# Altium PCB IoT_1062.PcbDoc (part 2 of 3)
Units mm, origin at the board's own origin, x right, y up, seen from the top; angles counter-clockwise.
Board outline 174.13 x 100.2 mm, 2 copper layers (Top Layer, Bottom Layer); 191 components, 138 nets, 1095 pads, 196 vias.
Unrouted connection lines stored in the file: 289.
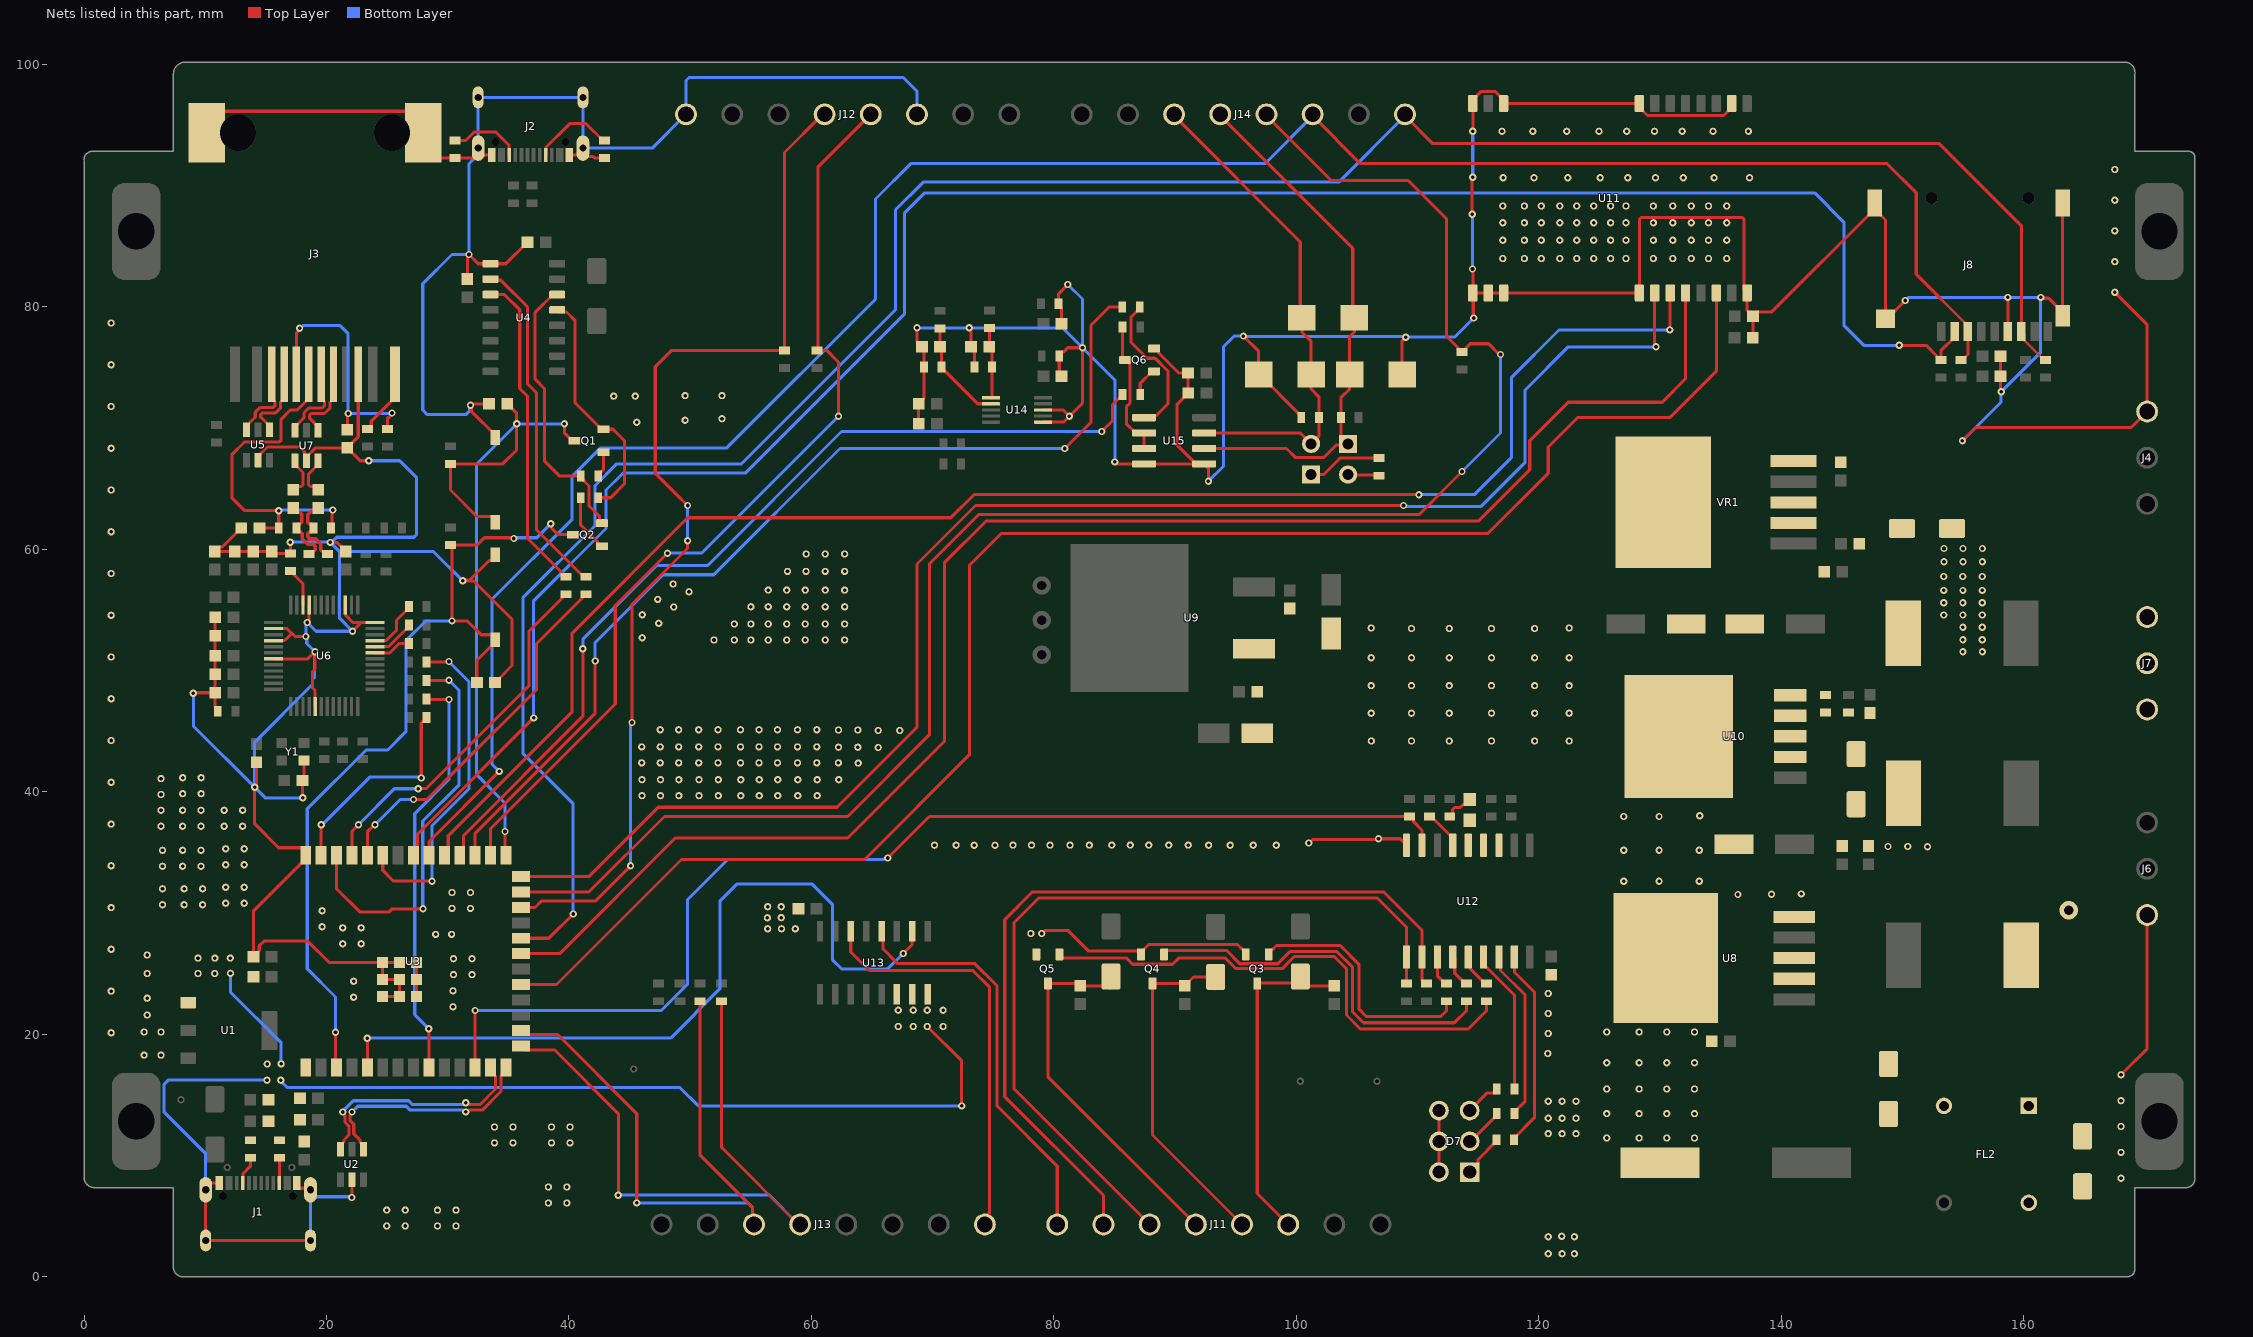
[diagram p2: the nets of this part, all layers, seen from the top]

## Via types
v1: diameter 0.6, hole 0.3, Top Layer to Bottom Layer, tented both sides, 195 vias
v2: diameter 1.524, hole 0.762, Top Layer to Bottom Layer, tented both sides, 1 vias

## Nets (pads, with @x,y where several pads share a name; then routed paths per layer and width w, separated by ;. In a path a pad name is that pad's centre, name@x,y a point inside that pad or via, vN(x,y) a via of type N, cw(c..) or ccw(c..) an arc to the next point about the centre after c; other vN are vias at no path point) (continued)
A+: D12.1 D13.2 J14.4 P1.1 R67.1 U15.6 | length 45
  Top Layer w0.254: U15.6@92.391,68.326 99.187,68.326 99.949,67.564 102.235,67.564 103.285,68.614 104.174,68.614 P1.1@104.267,68.707 103.669,69.305 R67.1@103.669,70.866 103.669,72.51 104.394,73.235 D12.1@104.394,74.422 104.394,77.547 104.781,77.934 D13.2@104.781,79.121 104.654,79.248 104.654,84.83 J14.4@93.726,95.758
AIN2: C48.2 R56.2 R58.1 U14.6 | length 5.9
  Top Layer w0.254: R56.2@74.676,78.269 74.676,76.72 C48.2@74.664,76.708 74.893,76.479 R58.1@74.893,75.057 74.893,72.514 74.88,72.501 U14.6@74.812,72.501
AIN3: C47.2 R55.2 R57.1 U14.7 | length 8.6
  Top Layer w0.254: R55.2@70.612,78.232 C47.2@70.612,76.708 70.739,76.581 70.739,74.932 70.937,74.734 70.99,74.734 73.71,72.014 74.799,72.014 U14.7@74.812,72.001
AUX: U3.19 U11.24 | length 136.4
  Top Layer w0.254: U3.19@36.048,24.117 38.976,24.117 49.276,34.417 64.389,34.417 73.025,43.053 73.025,58.674 75.665,61.314 115.797,61.314 120.777,66.294 120.777,68.453 123.19,70.866 130.81,70.866 134.644,74.7 U11.24@134.644,81.154
B-: D13.1 D14.2 J14.3 P2.2 R70.2 U15.7 | length 41.5
  Top Layer w0.254: J14.3@89.916,95.758 100.324,85.35 100.324,79.248 D13.1@100.451,79.121 100.451,77.934 101.219,77.166 D14.2@101.219,74.422 101.219,73.235 101.854,72.6 R70.2@101.854,70.866 101.854,69.342 P2.2@101.219,68.707 100.33,69.596 U15.7@92.391,69.596
BOOT: BOOT.1 C8.1 Q1.3 R11.2 U3.27 | length 60.9
  Top Layer w0.254: BOOT.1@33.909,62.23 33.909,62.43 33.636,62.703 32.42,62.703 30.226,64.897 R11.2@30.226,67.056 34.544,67.056 35.687,68.199 35.687,71.235 35.271,71.651 35.271,71.666 34.928,72.009 C8.1@34.913,72.009 ; v1(34.727,36.735) 34.727,34.843 U3.27@34.798,34.772 ; v1(39.624,70.358) 39.624,69.618 40.281,68.961 Q1.3@40.456,68.961
  Bottom Layer w0.254: v1(34.727,36.735) 34.727,39.06 32.385,41.402 32.385,67.049 35.685,70.349 v1(35.685,70.367) ; v1@35.694,70.358 v1(39.624,70.358)
CRD: C25.2 J3.P6 R26.1 R27.1 | length 28.2
  Top Layer w0.254: C25.2@14.478,61.763 R26.1@16.063,61.763 16.063,63.193 v1(16.06,63.196) 13.258,63.196 12.192,64.262 12.192,67.818 13.231,68.857 16.107,68.857 16.256,69.006 16.256,70.739 17.02,71.503 17.597,71.503 18.54,72.446 J3.P6@18.54,74.441 ; R27.1@20.373,61.763 20.447,61.837 20.447,63.087 20.519,63.159 v1(20.519,63.253)
  Bottom Layer w0.254: v1(16.06,63.196) 16.118,63.253 v1(20.519,63.253)
CS: J14.5 R71.2 U3.25 | length 144.8
  Top Layer w0.254: U3.25@36.048,31.737 41.643,31.737 47.879,37.973 62.992,37.973 69.723,44.704 69.723,58.801 73.787,62.865 110.109,62.865 v1(113.665,66.421) ; J14.5@97.536,95.758 102.87,90.424 109.22,90.424 112.395,87.249 112.395,77.56 113.342,76.613 113.342,76.488 R71.2@113.54,76.29 ; R71.2@113.665,76.29 114.337,76.962 115.857,76.962 116.746,76.073 v1(116.84,76.073)
  Bottom Layer w0.254: v1(113.665,66.421) 116.84,69.596 116.84,71.205 v1(116.84,76.073)
CS_CD: J8.2 R61.2 U3.33 | length 175.4
  Top Layer w0.254: U3.33@27.178,34.772 27.501,35.095 27.501,36.518 v1(37.084,46.101) ; v1(149.733,76.835) 151.945,76.835 152.839,75.941 152.839,75.816 153.037,75.618 R61.2@153.162,75.618 153.162,76.389 154.298,77.525 J8.2@154.298,77.975
  Bottom Layer w0.254: v1(37.084,46.101) 37.084,55.753 43.053,61.722 43.053,64.897 44.45,66.294 54.541,66.294 67.691,79.444 67.691,87.757 69.342,89.408 142.748,89.408 145.161,86.995 145.161,78.486 146.812,76.835 v1(149.733,76.835)
CTD: C27.2 J3.P5 R31.1 | length 21.3
  Top Layer w0.254: J3.P5@17.52,74.441 17.52,77.878 17.78,78.138 v1(17.78,78.232) ; C27.2@21.717,69.879 21.717,71.136 v1(21.788,71.207) ; R31.1@25.019,69.944 25.019,70.772 25.4,71.153 v1(25.4,71.247)
  Bottom Layer w0.254: v1(17.78,78.232) 17.848,78.232 18.102,78.486 21.082,78.486 21.788,77.78 v1(21.788,71.207) 21.808,71.227 25.38,71.227 v1(25.4,71.247)
D_N: U2.6 U3.13 | length 19
  Top Layer w0.254: U2.6@21.148,10.526 21.148,10.836 21.44,11.128 21.44,11.291 21.844,11.695 21.844,12.421 21.521,12.744 21.521,13.322 21.348,13.495 v1(21.348,13.589) ; v1@31.738,14.203 32.655,14.203 33.936,15.484 33.936,16.564 33.528,16.972 U3.13@33.528,17.272
  Bottom Layer w0.254: v1(21.348,13.589) 21.348,13.655 22.217,14.524 26.776,14.524 27.097,14.203 31.254,14.203 31.402,14.351 v1(31.496,14.351)
D_P: U2.4 U3.14 | length 18.8
  Top Layer w0.254: v1(22.098,13.589) 22.098,13.495 21.925,13.322 21.925,12.911 22.248,12.588 22.248,11.799 22.652,11.395 22.756,11.291 22.756,11.128 23.048,10.836 U2.4@23.048,10.526 ; v1@31.738,13.749 32.843,13.749 34.39,15.296 34.39,16.564 34.798,16.972 U3.14@34.798,17.272
  Bottom Layer w0.254: v1(22.098,13.589) 22.58,14.07 26.588,14.07 26.909,13.749 31.254,13.749 31.402,13.601 v1(31.496,13.601)
DTR: Q1.2 R14.2 U4.13 | length 20.2
  Top Layer w0.254: U4.13@39.028,79.756 39.205,79.579 39.801,79.579 40.513,78.867 40.513,72.079 42.681,69.911 43.627,69.911 44.577,68.961 44.577,65.405 43.434,64.262 R14.2@42.418,64.262
ESP32_CLK: R34.1 U3.38 | length 33.1
  Top Layer w0.254: U3.38@20.828,34.772 20.828,32.004 22.733,30.099 25.163,30.099 25.417,30.353 v1(27.959,30.353) ; R34.1@28.247,49.19 30.025,49.19 v1@30.046,49.211
  Bottom Layer w0.254: v1(27.959,30.353) 27.94,30.372 27.94,37.592 30.942,40.594 30.942,48.368 v1(30.099,49.211)
ESP32_CS: R35.1 U3.35 | length 27.6
  Top Layer w0.254: U3.35@24.638,34.772 24.638,33.528 25.527,32.639 v1(28.702,32.639) ; R35.1@28.247,50.714 30.035,50.714 v1@30.074,50.753
  Bottom Layer w0.254: v1(28.702,32.639) 28.702,37.211 31.75,40.259 31.75,49.076 v1@30.074,50.753
  other v1: 30.099,50.753
ESP32_MISO: R33.1 U3.9 | length 33.9
  Top Layer w0.254: R33.1@28.247,47.666 28.288,47.625 v1(30.099,47.625) ; v1(28.444,20.457) 28.448,20.453 U3.9@28.448,17.272
  Bottom Layer w0.254: v1(28.444,20.457) 27.278,21.623 27.278,38.2 30.099,41.021 v1(30.099,47.625)
ESP32_MOSI: R32.1 U3.39 | length 17.6
  Top Layer w0.254: U3.39@19.558,34.772 v1@19.558,37.211 ; v1(27.813,41.148) 27.813,45.67 27.962,45.819 28.049,45.819 28.247,46.017 R32.1@28.247,46.142
  Bottom Layer w0.254: v1(19.558,37.298) 19.652,37.298 20.264,37.911 23.567,41.214 27.747,41.214 v1(27.813,41.148)
ETH_RX_N: C21.2 U7.3 | length 3.3
  Top Layer w0.254: C21.2@19.304,64.914 19.033,65.185 18.664,65.185 18.515,65.334 18.515,66.211 19.304,67 U7.3@19.304,67.31
ETH_RX_P: C22.2 U7.1 | length 3.2
  Top Layer w0.254: C22.2@17.272,64.914 17.543,65.185 17.912,65.185 18.061,65.334 18.061,66.343 17.404,67 U7.1@17.404,67.31
EXPRES1: R23.1 U6.10 | length 3.3
  Top Layer w0.254: R23.1@17.018,58.207 17.143,58.207 17.341,58.009 17.341,57.884 18.062,57.163 U6.10@18.062,55.402
GND: BOOT.2 C1.1 C2.1 C3.1 C4.1 C5.1 C6.1 C7.1 C8.2 C9.2 C10.1 C11.1 C12.2 C13.2 C14.2 C15.2 C16.2 C17.2 C18.2 C19.2 C20.2 C23.2 C24.2 C25.1 C26.2 C27.1 C28.2 C29.1 C30.2 C31.1 C32.1 C33.2 C34.1 C35.2 C36.2 C37.1 C38.1 C39.1 C40.1 C42.1 C43.2 C44.1 C45.1 C46.1 C47.1 C48.1 C49.1 C50.1 C51.1 C52.1 C53.1 C54.1 C55.1 C56.1 D4.A D5.A D6.A D7.2 D7.4 D7.6 D8.1 D12.2 D14.1 FL2.2 J1.A1_B12 J1.B1_A12 J1.SH1 J1.SH2 J1.SH3 J1.SH4 J2.A1_B12 J2.B1_A12 J2.SH1 J2.SH2 J2.SH3 J2.SH4 J3.P10 J3.SH1 J3.SH2 J4.3 J6.1 J8.6 J8.G1 J8.G2 J8.G3 J8.G4 J12.1 J12.6 pad.6@2.235,20.125 pad.6@2.235,23.569 pad.6@2.235,27.013 pad.6@2.235,30.457 pad.6@2.235,33.9 pad.6@2.235,37.344 pad.6@2.235,40.788 pad.6@2.235,44.232 pad.6@2.235,47.676 pad.6@2.235,51.12 pad.6@2.235,54.564 pad.6@2.235,58.008 pad.6@2.235,61.452 pad.6@2.235,64.896 pad.6@2.235,68.34 pad.6@2.235,71.784 pad.6@2.235,75.228 pad.6@2.235,78.672 pad.6@4.953,18.288 pad.6@4.953,20.193 pad.6@5.207,21.59 pad.6@5.207,22.987 pad.6@5.207,25.019 pad.6@5.207,26.543 pad.6@6.35,18.288 pad.6@6.35,20.193 pad.6@6.35,37.165 pad.6@6.35,38.481 pad.6@6.35,39.78 pad.6@6.35,41.096 pad.6@6.477,30.688 pad.6@6.477,32.004 pad.6@6.477,33.863 pad.6@6.477,35.179 pad.6@8.128,33.863 pad.6@8.128,35.179 pad.6@8.128,37.165 pad.6@8.128,38.481 pad.6@8.133,39.855 pad.6@8.133,41.171 pad.6@8.255,30.688 pad.6@8.255,32.004 pad.6@9.398,25.019 pad.6@9.398,26.289 pad.6@9.652,33.863 pad.6@9.652,35.179 pad.6@9.652,37.165 pad.6@9.652,38.481 pad.6@9.657,39.855 pad.6@9.657,41.171 pad.6@9.779,30.688 pad.6@9.779,32.004 pad.6@10.779,25.013 pad.6@10.795,26.289 pad.6@11.557,37.165 pad.6@11.557,38.481 pad.6@11.684,30.815 pad.6@11.684,32.131 pad.6@11.684,33.99 pad.6@11.684,35.306 pad.6@12.065,26.289 pad.6@12.085,25.034 pad.6@13.081,37.165 pad.6@13.081,38.481 pad.6@13.208,30.815 pad.6@13.208,32.131 pad.6@13.208,33.99 pad.6@13.208,35.306 pad.6@15.091,16.221 pad.6@15.111,17.552 pad.6@16.234,16.221 pad.6@16.256,17.562 pad.6@19.638,28.874 pad.6@19.638,30.19 pad.6@21.332,27.467 pad.6@21.332,28.783 pad.6@22.237,23.058 pad.6@22.237,24.374 pad.6@22.856,27.467 pad.6@22.856,28.783 pad.6@24.97,4.187 pad.6@24.97,5.503 pad.6@26.494,4.187 pad.6@26.494,5.503 pad.6@29.001,28.241 pad.6@29.161,4.187 pad.6@29.161,5.503 pad.6@30.317,28.241 pad.6@30.349,30.388 pad.6@30.349,31.704 pad.6@30.433,22.27 pad.6@30.433,23.586 pad.6@30.476,24.927 pad.6@30.476,26.243 pad.6@30.685,4.187 pad.6@30.685,5.503 pad.6@31.873,30.388 pad.6@31.873,31.704 pad.6@32,24.927 pad.6@32,26.243 pad.6@33.86,11.045 pad.6@33.86,12.361 pad.6@35.384,11.045 pad.6@35.384,12.361 pad.6@38.305,6.092 pad.6@38.305,7.408 pad.6@38.559,11.045 pad.6@38.559,12.361 pad.6@39.829,6.092 pad.6@39.829,7.408 pad.6@40.083,11.045 pad.6@40.083,12.361 pad.6@43.688,72.644 pad.6@45.466,72.644 pad.6@45.593,70.485 pad.6@45.998,42.391 pad.6@45.998,43.707 pad.6@46.05,54.606 pad.6@46.022,39.69 pad.6@46.022,41.006 pad.6@46.041,52.71 pad.6@47.32,55.876 pad.6@47.406,53.902 pad.6@47.522,42.391 pad.6@47.522,43.707 pad.6@47.522,45.121 pad.6@47.546,39.69 pad.6@47.546,41.006 pad.6@48.59,57.146 pad.6@48.641,55.245 pad.6@49.07,39.69 pad.6@49.07,41.006 pad.6@49.046,42.391 pad.6@49.046,43.707 pad.6@49.046,45.121 pad.6@49.579,70.655 pad.6@49.579,72.687 pad.6@49.898,56.502 pad.6@50.697,42.391 pad.6@50.697,43.707 pad.6@50.697,45.121 pad.6@50.721,39.69 pad.6@50.721,41.006 pad.6@51.965,52.532 pad.6@52.299,42.391 pad.6@52.299,43.707 pad.6@52.299,45.121 pad.6@52.323,39.69 pad.6@52.323,41.006 pad.6@52.627,70.782 pad.6@52.627,72.687 pad.6@53.644,52.532 pad.6@53.644,53.848 pad.6@54.148,42.391 pad.6@54.148,43.707 pad.6@54.148,45.121 pad.6@54.172,39.69 pad.6@54.172,41.006 pad.6@55.01,52.532 pad.6@55.01,53.848 pad.6@55.01,55.262 pad.6@55.672,42.391 pad.6@55.672,43.707 pad.6@55.672,45.121 pad.6@55.696,39.69 pad.6@55.696,41.006 pad.6@56.368,29.611 pad.6@56.388,28.702 pad.6@56.388,30.533 pad.6@56.438,52.532 pad.6@56.438,53.848 pad.6@56.438,55.262 pad.6@56.438,56.643 pad.6@57.22,39.69 pad.6@57.22,41.006 pad.6@57.196,42.391 pad.6@57.196,43.707 pad.6@57.196,45.121 pad.6@57.506,30.533 pad.6@57.508,29.628 pad.6@57.531,28.702 pad.6@57.962,52.532 pad.6@57.962,53.848 pad.6@57.962,55.262 pad.6@57.962,56.643 pad.6@58.028,58.185 pad.6@58.674,28.702 pad.6@58.847,42.391 pad.6@58.847,43.707 pad.6@58.847,45.121 pad.6@58.871,39.69 pad.6@58.871,41.006 pad.6@59.486,52.532 pad.6@59.486,53.848 pad.6@59.486,55.262 pad.6@59.486,56.643 pad.6@59.552,58.185 pad.6@59.563,59.619 pad.6@60.448,42.391 pad.6@60.448,43.707 pad.6@60.448,45.121 pad.6@60.473,39.69 pad.6@60.473,41.006 pad.6@61.137,52.532 pad.6@61.137,53.848 pad.6@61.137,55.262 pad.6@61.137,56.643 pad.6@61.137,58.185 pad.6@61.137,59.619 pad.6@62.23,43.688 pad.6@62.23,45.102 pad.6@62.25,41.006 pad.6@62.226,42.391 pad.6@62.738,52.532 pad.6@62.738,53.848 pad.6@62.738,55.262 pad.6@62.738,56.643 pad.6@62.738,58.185 pad.6@62.738,59.619 pad.6@63.86,42.372 pad.6@63.831,43.688 pad.6@63.831,45.102 pad.6@65.507,43.663 pad.6@65.507,45.06 pad.6@67.163,20.65 pad.6@67.163,21.991 pad.6@67.285,45.06 pad.6@68.396,20.65 pad.6@68.396,21.991 pad.6@69.552,20.65 pad.6@69.552,21.991 pad.6@70.153,35.603 pad.6@70.859,20.65 pad.6@70.859,21.991 pad.6@71.931,35.603 pad.6@73.425,35.593 pad.6@75.142,35.593 pad.6@76.627,35.61 pad.6@78.105,28.321 pad.6@78.151,35.61 pad.6@78.994,28.321 pad.6@79.675,35.61 pad.6@81.326,35.61 pad.6@82.927,35.61 pad.6@84.776,35.61 pad.6@86.3,35.61 pad.6@87.824,35.61 pad.6@89.475,35.61 pad.6@91.077,35.61 pad.6@92.759,35.603 pad.6@94.537,35.603 pad.6@96.442,35.603 pad.6@98.347,35.603 pad.6@106.172,46.491 pad.6@106.172,48.768 pad.6@106.172,51.059 pad.6@106.172,53.522 pad.6@106.188,44.193 pad.6@109.492,44.201 pad.6@109.492,46.491 pad.6@109.492,48.768 pad.6@109.492,51.059 pad.6@109.492,53.472 pad.6@112.614,44.201 pad.6@112.614,46.491 pad.6@112.614,48.768 pad.6@112.614,51.059 pad.6@112.614,53.472 pad.6@116.096,44.201 pad.6@116.096,46.491 pad.6@116.096,48.768 pad.6@116.096,51.059 pad.6@116.096,53.472 pad.6@116.967,94.488 pad.6@117.031,83.99 pad.6@117.031,85.503 pad.6@117.031,86.946 pad.6@117.031,88.332 pad.6@117.056,90.658 pad.6@118.809,83.99 pad.6@118.809,85.503 pad.6@118.809,86.946 pad.6@118.809,88.332 pad.6@119.507,94.488 pad.6@119.596,90.658 pad.6@119.649,44.201 pad.6@119.649,46.491 pad.6@119.649,48.768 pad.6@119.649,51.059 pad.6@119.649,53.472 pad.6@120.206,83.99 pad.6@120.206,85.503 pad.6@120.206,86.946 pad.6@120.206,88.332 pad.6@120.744,18.415 pad.6@120.777,1.905 pad.6@120.777,3.302 pad.6@120.777,11.811 pad.6@120.777,13.081 pad.6@120.777,14.478 pad.6@120.777,20.066 pad.6@120.777,21.717 pad.6@120.777,23.368 pad.6@121.73,83.99 pad.6@121.73,85.503 pad.6@121.73,86.946 pad.6@121.73,88.332 pad.6@121.92,1.905 pad.6@121.92,11.811 pad.6@121.92,13.081 pad.6@121.92,14.478 pad.6@121.883,3.339 pad.6@122.5,44.201 pad.6@122.5,46.491 pad.6@122.5,48.768 pad.6@122.5,51.059 pad.6@122.5,53.522 pad.6@122.39,90.658 pad.6@122.301,94.488 pad.6@122.936,1.905 pad.6@122.936,3.302 pad.6@123.063,11.811 pad.6@123.063,13.081 pad.6@123.063,14.478 pad.6@123.127,83.99 pad.6@123.127,85.503 pad.6@123.127,86.946 pad.6@123.127,88.332 pad.6@124.524,83.99 pad.6@124.524,85.503 pad.6@124.524,86.946 pad.6@124.524,88.332 pad.6@124.968,94.488 pad.6@125.057,90.658 pad.6@125.603,11.445 pad.6@125.603,13.462 pad.6@125.603,15.494 pad.6@125.603,17.655 pad.6@125.603,20.193 pad.6@125.921,83.99 pad.6@125.921,85.503 pad.6@125.921,86.946 pad.6@125.921,88.332 pad.6@127.191,83.99 pad.6@127.191,85.503 pad.6@127.191,86.946 pad.6@127.191,88.332 pad.6@127.254,94.488 pad.6@127.343,90.658 pad.6@128.27,11.445 pad.6@128.27,13.462 pad.6@128.27,15.494 pad.6@128.27,17.655 pad.6@128.27,20.193 pad.6@129.54,94.488 pad.6@129.453,83.99 pad.6@129.453,85.503 pad.6@129.453,86.946 pad.6@129.453,88.332 pad.6@129.629,90.658 pad.6@130.556,11.445 pad.6@130.556,13.462 pad.6@130.556,15.494 pad.6@130.556,17.655 pad.6@130.556,20.193 pad.6@131.053,83.99 pad.6@131.053,85.503 pad.6@131.053,86.946 pad.6@131.053,88.332 pad.6@131.826,94.488 pad.6@131.915,90.658 pad.6@132.577,83.99 pad.6@132.577,85.503 pad.6@132.577,86.946 pad.6@132.577,88.332 pad.6@132.842,11.445 pad.6@132.842,13.462 pad.6@132.842,15.494 pad.6@132.842,17.655 pad.6@132.842,20.193 pad.6@133.993,83.99 pad.6@133.993,85.503 pad.6@133.993,86.946 pad.6@133.993,88.332 pad.6@134.366,94.488 pad.6@134.455,90.658 pad.6@135.498,83.99 pad.6@135.498,85.503 pad.6@135.498,86.946 pad.6@135.498,88.332 pad.6@137.287,94.488 pad.6@137.376,90.658 pad.6@167.513,81.205 pad.6@167.513,83.738 pad.6@167.513,86.271 pad.6@167.513,88.804 pad.6@167.513,91.337 pad.6@168.021,8.128 pad.6@168.021,10.261 pad.6@168.021,12.395 pad.6@168.021,14.528 pad.6@168.021,16.661 Q3.2 Q4.2 Q5.2 Q6.2 R1.1 R2.1 R8.1 R9.1 R23.2 R24.2 R37.1 R57.2 R58.2 R59.2 R60.2 R70.1 RESET.2 U1.1 U2.2 U3.1 U3.40 U3.41_1 U3.41_2 U3.41_3 U3.41_4 U3.41_5 U3.41_6 U3.41_7 U3.41_8 U3.41_9 U4.1 U5.2 U6.3 U6.9 U6.14 U6.16 U6.19 U6.29 U6.48 U7.2 U8.3 U8.5 U8.6 U9.1 U10.3 U10.5 U10.6 U11.2 U11.8 U11.11 U11.13 U11.14 U11.15 U11.16 U11.19 U11.26 U12.3 U12.4 U12.5 U12.9 U13.6 U13.7 U13.8 U14.1 U14.3 U15.4 U15.5 VR1.3 VR1.5 VR1.6 Y1.2 | length 784.8
  Top Layer w0.254: v1(9.017,48.133) 9.058,48.174 C23.2@10.819,48.174 ; J3.SH1@10.13,94.361 10.13,94.769 11.503,96.142 26.597,96.142 27.97,94.769 J3.SH2@27.97,94.361 27.97,93.657 29.343,92.284 R9.1@30.607,92.284 32.002,92.284 32.51,92.792 J2.SH2@32.51,92.9 ; C17.2@10.819,54.397 C16.2@10.819,52.873 C14.2@10.819,51.222 C24.2@10.819,49.698 C23.2@10.819,48.174 ; R24.2@11.029,46.65 11.029,46.775 10.819,46.985 C23.2@10.819,48.174 ; J1.A1_B12@11.155,7.747 10.403,7.747 10.035,7.379 J1.SH1@10.035,7.177 J1.SH3@10.035,2.997 J1.SH4@18.675,2.997 ; C25.1@12.978,61.763 12.963,61.763 11.392,60.192 11.138,60.192 10.795,59.849 C12.2@10.795,59.834 C19.2@12.446,59.834 C18.2@13.97,59.834 C13.2@15.494,59.834 15.671,59.657 R23.2@17.018,59.657 17.018,60.568 v1(17.001,60.585) ; v1(14.074,40.371) 14.074,37.361 16.043,35.392 17.965,35.392 18.288,35.069 U3.40@18.288,34.772 18.288,34.472 13.97,30.154 C4.1@13.97,26.416 13.985,26.416 14.328,26.759 14.328,26.785 14.451,26.908 14.451,27.294 14.843,27.686 18.455,27.686 20.219,25.922 U3.41_3@24.608,25.922 ; v1@14.224,40.615 C20.2@14.224,42.448 ; U5.2@14.351,67.366 14.351,67.676 15.128,68.453 17.78,68.453 18.195,68.038 18.195,67.469 U7.2@18.354,67.31 18.354,67.62 19.113,68.379 C27.1@21.717,68.379 ; U6.19@15.632,50.972 18.46,50.972 v1(19.05,51.562) 19.05,50.123 18.85,49.923 18.85,48.578 19.062,48.366 U6.29@19.062,47.042 ; U6.16@15.632,52.472 15.645,52.485 16.544,52.485 17.129,53.07 16.728,53.472 U6.14@15.632,53.472 ; 17.145,53.086 17.418,52.813 v1(18.302,52.813) ; J1.B1_A12@17.555,7.747 17.555,7.477 17.728,7.304 18.548,7.304 J1.SH2@18.675,7.177 ; v1(18.032,39.507) 18.01,39.529 C26.2@18.01,40.935 18.161,41.086 Y1.2@18.161,42.583 ; v1@18.562,54.216 U6.9@18.562,55.402 ; v1(20.32,60.579) 20.845,60.579 C15.2@21.59,59.834 ; U6.3@21.562,55.402 21.575,55.389 21.575,54.572 22.175,53.972 22.866,53.972 ; v1(22.091,6.537) 22.095,6.54 22.095,8.013 U2.2@22.098,8.016 ; v1(22.144,53.25) 22.866,53.972 ; J3.P10@22.62,74.441 22.62,69.297 21.717,68.394 C27.1@21.717,68.379 ; v1(23.495,67.31) 22.771,67.31 21.717,68.364 C27.1@21.717,68.379 ; U6.48@23.992,53.972 22.866,53.972 ; U3.41_1@24.608,23.122 U3.41_4@26.008,23.122 U3.41_5@26.008,24.522 U3.41_2@24.608,24.522 U3.41_3@24.608,25.922 ; U3.41_7@27.408,23.122 U3.41_8@27.408,24.522 U3.41_9@27.408,25.922 U3.41_6@26.008,25.922 U3.41_3@24.608,25.922 ; C7.1@31.623,82.296 v1@31.623,84.107 ; v1(31.75,84.328) 32.512,83.566 U4.1@33.528,83.566 34.795,83.566 36.573,85.344 C6.1@36.588,85.344 ; J2.SH2@32.51,93.102 J2.SH2@32.51,92.9 ; C8.2@33.413,72.009 32.098,72.009 31.971,71.882 v1(31.877,71.882) 31.943,71.816 31.943,71.396 33.909,69.43 BOOT.2@33.909,69.23 ; J2.B1_A12@33.63,92.532 32.878,92.532 J2.SH2@32.51,92.9 ; C9.2@33.909,49.022 33.924,49.022 34.267,49.365 34.267,49.38 35.306,50.419 35.306,54.229 32.131,57.404 v1(31.242,57.404) 31.308,57.47 31.816,57.47 33.436,59.09 33.636,59.09 33.909,59.363 RESET.2@33.909,59.563 ; J2.A1_B12@40.03,92.532 40.782,92.532 J2.SH1@41.15,92.9 ; J2.SH1@41.15,93.102 J2.SH1@41.15,92.9 ; R8.1@42.926,92.284 42.095,92.284 41.954,92.425 41.518,92.425 41.15,92.792 J2.SH1@41.15,92.9 ; v1(68.712,78.274) 68.712,77.108 C47.1@69.112,76.708 69.289,76.531 R57.2@69.289,75.057 69.289,72.437 68.861,72.009 C45.1@68.846,72.009 68.846,70.37 C46.1@68.858,70.358 ; pad.6@69.552,20.65 72.39,17.812 v1(72.39,14.097) ; v1(73.008,78.274) 73.008,78.181 73.164,78.025 C48.1@73.164,76.708 73.443,76.429 R58.2@73.443,75.057 ; Q5.2@78.679,26.178 Q5.2@78.708,26.207 ; pad.6@78.994,28.321 79.062,28.321 79.316,28.575 81.153,28.575 82.836,26.892 86.99,26.892 Q4.2@87.188,26.694 ; U14.1@79.112,70.501 80.788,70.501 v1(81.28,70.993) ; U14.3@79.112,71.501 80.772,71.501 v1(81.28,70.993) ; C49.1@80.633,74.295 80.444,74.484 R59.2@80.444,75.946 80.444,76.071 80.642,76.269 80.767,76.269 81.133,76.635 v1(82.355,76.635) 82.355,72.068 v1(81.28,70.993) ; C50.1@80.633,78.613 80.633,79.897 80.391,80.139 R60.2@80.391,80.264 80.391,81.098 v1(81.15,81.857) ; v1(85.023,67.217) 85.184,67.056 U15.4@87.441,67.056 U15.5@91.701,67.056 ; Q4.2@87.188,26.6 Q4.2@87.188,26.694 ; Q6.2@88.265,76.576 88.44,76.576 88.638,76.378 88.638,76.203 90.292,74.549 C53.1@91.071,74.549 91.071,72.91 C54.1@91.083,72.898 90.17,71.985 90.17,68.587 U15.5@91.701,67.056 ; v1(92.744,65.612) 92.744,66.703 U15.5@92.391,67.056 U15.5@91.701,67.056 ; v1(95.631,77.597) 96.889,76.339 D14.1@96.889,74.422 96.969,74.422 100.202,71.189 100.206,71.189 100.404,70.991 R70.1@100.404,70.866 ; Q3.2@95.824,26.6 95.824,26.775 95.626,26.973 95.582,26.973 95.146,27.409 87.822,27.409 87.188,26.775 Q4.2@87.188,26.694 ; v1(101.029,35.78) 101.063,35.78 101.351,36.068 106.71,36.068 v1(106.773,36.131) 108.56,36.131 U12.9@109.093,35.598 ; D12.2@108.724,74.422 108.724,77.215 v1(109.016,77.507) ; D7.2@111.76,8.636 D7.4@111.76,11.176 D7.6@111.76,13.716 ; v1(114.505,87.644) 114.505,90.659 v1(114.55,90.704) ; v1(114.528,83.132) 114.554,83.106 U11.14@114.554,81.154 ; v1(114.554,94.488) U11.13@114.554,96.774 114.554,97.094 115.22,97.76 116.428,97.76 117.094,97.094 U11.11@117.094,96.774 U11.8@128.294,96.774 128.294,96.454 128.96,95.788 135.248,95.788 135.914,96.454 U11.2@135.914,96.774 ; v1(114.627,79.088) 114.59,79.124 114.59,81.118 U11.14@114.554,81.154 ; C55.1@137.644,77.47 137.668,77.494 C56.1@137.668,79.248 ; J8.G4@147.698,88.575 J8.G4@147.698,88.075 ; v1(150.234,80.531) 148.727,79.025 J8.G2@148.598,79.025 148.598,87.175 J8.G4@147.698,88.075 ; v1(154.94,68.961) 156.031,70.052 168.858,70.052 J4.3@170.18,71.374 170.18,78.538 pad.6@167.513,81.205 ; C51.1@158.091,75.946 C52.1@158.091,74.295 158.091,73.057 v1(158.14,73.008) ; v1(158.671,80.786) 158.684,80.773 158.684,77.989 J8.6@158.698,77.975 ; v1(161.392,80.786) 161.458,80.72 162.053,80.72 J8.G1@163.198,79.575 ; J8.G1@163.198,79.275 J8.G1@163.198,79.575 ; J8.G3@163.198,88.575 J8.G1@163.198,79.575 ; pad.6@168.021,16.661 170.18,18.82 J6.1@170.18,29.845 ; U11.14@114.554,81.154 U11.15@115.824,81.154 U11.16@117.094,81.154 U11.19@128.294,81.154 128.294,87.227 128.443,87.376 136.789,87.376 136.937,87.227 136.937,81.401 U11.26@137.184,81.154 137.184,79.717 137.653,79.248 C56.1@137.668,79.248 ; C56.1@137.668,79.248 138.011,79.591 139.214,79.591 J8.G4@147.698,88.075
  Bottom Layer w0.254: v1(9.017,48.133) 9.017,45.428 v1(14.074,40.371) ; J1.SH1@10.035,7.177 10.035,10.142 6.604,13.573 6.604,15.875 6.95,16.221 pad.6@15.091,16.221 ; pad.6@12.085,25.034 12.085,23.483 16.256,19.312 pad.6@16.256,17.562 ; pad.6@16.234,16.221 16.234,16.14 16.753,15.621 49.149,15.621 50.673,14.097 v1(72.39,14.097) ; v1(17.001,60.585) 17.033,60.617 20.282,60.617 v1(20.32,60.579) ; v1(18.032,39.507) 14.938,39.507 v1(14.074,40.371) ; v1@18.302,53.768 v1(18.302,52.813) 18.368,52.747 18.368,52.244 v1(19.05,51.562) 19.023,51.535 19.023,49.436 18.85,49.263 18.85,48.87 14.074,44.094 v1(14.074,40.371) ; v1(18.415,53.975) 19.14,53.25 v1(22.144,53.25) 21.082,54.313 21.082,59.817 ; J1.SH4@18.675,2.997 J1.SH2@18.675,6.971 ; J1.SH2@18.675,7.177 J1.SH2@18.675,6.971 ; v1(22.091,6.537) 22.025,6.603 19.043,6.603 J1.SH2@18.675,6.971 ; v1(23.495,67.31) 26.035,67.31 27.432,65.913 27.432,61.236 27.201,61.004 20.839,61.004 20.414,60.579 v1(20.32,60.579) ; v1(31.242,57.404) 28.829,59.817 21.082,59.817 ; v1(31.877,71.882) 31.811,71.816 31.811,71.434 31.496,71.12 28.321,71.12 27.94,71.501 27.94,81.915 30.353,84.328 v1(31.75,84.328) 31.75,91.817 32.51,92.577 J2.SH4@32.51,97.282 J2.SH3@41.15,97.282 J2.SH1@41.15,93.102 46.874,93.102 J12.1@49.657,95.885 49.657,98.679 49.911,98.933 67.564,98.933 68.707,97.79 J12.6@68.707,95.885 ; v1(68.712,78.274) v1(73.008,78.274) 80.715,78.274 v1(82.355,76.635) ; v1(81.15,81.857) 82.355,80.651 v1(82.355,76.635) ; v1(85.023,67.217) 85.023,73.967 v1(82.355,76.635) ; v1(92.744,65.612) 93.997,66.865 93.997,76.725 94.869,77.597 v1(95.631,77.597) 95.676,77.552 108.97,77.552 v1(109.016,77.507) 113.046,77.507 v1(114.627,79.088) ; v1(106.773,36.131) v1@106.773,36.224 ; v1(114.505,87.644) 114.528,87.621 v1(114.528,83.132) ; v1(114.55,90.704) 114.552,90.706 114.552,94.486 v1(114.554,94.488) ; v1(150.234,80.531) 150.489,80.786 v1(158.671,80.786) v1(161.392,80.786) 161.392,76.259 v1(158.14,73.008) 158.14,72.161 v1(154.94,68.961) ; v1(20.32,60.579) 21.082,59.817
  other v1: 136.42,31.536 139.19,31.557 141.645,31.582 127,32.639 129.921,32.639 133.223,32.639 127,35.179 129.921,35.179 133.223,35.179 150.425,35.496 152.055,35.482 148.805,35.5 127,37.973 129.921,37.973 133.27,38.022 154.981,51.562 156.591,51.562 154.981,52.553 156.585,52.553 154.981,53.569 156.585,53.569 153.41,54.585 154.981,54.585 156.585,54.585 153.41,55.601 154.981,55.601 156.585,55.601 153.41,56.617 154.981,56.617 156.585,56.617 153.408,57.764 154.978,57.764 156.583,57.764 153.416,58.977 154.987,58.977 156.591,58.977 153.416,60.071 154.987,60.071 156.591,60.071
GPIO_3: J13.5 R72.2 U3.15 | length 54
  Top Layer w0.254: U3.15@36.048,19.037 36.371,18.714 38.817,18.714 44.069,13.462 v1(44.069,6.731) ; R72.2@52.578,22.733 52.578,10.681 J13.5@58.941,4.318
  Bottom Layer w0.254: v1(44.069,6.731) 44.098,6.76 56.499,6.76 J13.5@58.941,4.318
GPIO_35: J12.5 R73.2 U3.28 | length 77.5
  Top Layer w0.254: U3.28@33.528,34.772 33.528,36.957 43.815,47.244 43.815,55.372 v1(48.133,59.69) ; v1(62.23,70.993) 62.23,75.438 61.251,76.417 R73.2@60.452,76.417 60.534,76.499 60.534,91.522 J12.5@64.77,95.758
  Bottom Layer w0.254: v1(48.133,59.69) 50.927,59.69 v1(62.23,70.993)
GPIO_36: R68.2 U3.29 | length 81.3
  Top Layer w0.254: U3.29@32.258,34.772 32.258,36.576 42.164,46.482 v1(42.164,50.8) ; v1(80.899,68.326) 83.058,70.485 83.058,78.486 84.582,80.01 R68.2@85.635,80.01
  Bottom Layer w0.254: v1(42.164,50.8) 42.164,52.324 47.752,57.912 51.943,57.912 62.357,68.326 v1(80.899,68.326)
GPIO_37: R66.2 U3.30 | length 75.7
  Top Layer w0.254: U3.30@30.988,34.772 31.311,35.095 31.311,36.401 41.148,46.238 v1(41.148,51.816) ; v1(83.947,69.723) 84.836,70.612 84.836,71.935 R66.2@85.672,72.771
  Bottom Layer w0.254: v1(41.148,51.816) 41.148,52.578 47.244,58.674 51.435,58.674 62.484,69.723 v1(83.947,69.723)
GPIO_46: J13.6 R76.2 U3.16 | length 51.1
  Top Layer w0.254: U3.16@36.048,20.307 36.371,19.984 39.071,19.984 45.593,13.462 v1(45.593,6.096) ; R76.2@50.8,22.733 50.8,10.059 55.131,5.728 J13.6@55.131,4.318
  Bottom Layer w0.254: v1(45.593,6.096) 54.763,6.096 55.131,5.728 J13.6@55.131,4.318
GPIO_47: J12.4 R77.2 U3.24 | length 86.6
  Top Layer w0.254: U3.24@36.048,30.467 37.198,30.467 37.719,30.988 42.164,30.988 v1(45.085,33.909) ; v1(45.197,45.727) 45.197,55.484 49.784,60.071 v1(49.784,60.706) ; v1(49.784,63.627) 48.859,64.552 47.117,66.294 47.117,75.057 48.477,76.417 R77.2@57.785,76.417 57.785,92.743 60.8,95.758 J12.4@60.96,95.758
  Bottom Layer w0.254: v1(45.085,33.909) 45.085,45.615 v1(45.197,45.727) ; v1(49.784,60.706) v1(49.784,63.627)
GREE: J3.P12 R28.1 | length 5.5
  Top Layer w0.254: R28.1@23.368,69.944 23.493,69.944 23.691,70.142 23.691,70.577 25.66,72.546 J3.P12@25.66,74.441
"IN +": D3.A J7.1 J7.3
  other v2: 163.703,30.226
"IN -": FL2.1 J7.2
INT_23008: R46.1 U3.12 U12.8 | length 95.4
  Top Layer w0.254: U3.12@32.258,17.272 v1(32.258,21.971) ; v1(66.294,34.544) 69.723,37.973 109.472,37.973 109.67,37.775 109.67,37.523 110.363,36.83 U12.8@110.363,35.598
  Bottom Layer w0.254: v1(32.258,21.971) 47.625,21.971 49.784,24.13 49.784,31.115 53.086,34.417 65.972,34.417 66.033,34.478 66.228,34.478 v1(66.294,34.544)
IO1: J11.6 R42.1 U12.10 | length 68.4
  Top Layer w0.254: J11.6@87.897,4.318 76.708,15.507 76.708,29.21 78.74,31.242 106.68,31.242 109.087,28.835 109.087,26.384 U12.10@109.093,26.378 R42.1@109.093,24.183
IO2: J11.7 R41.1 U12.11 | length 69.8
  Top Layer w0.254: J11.7@84.087,4.318 84.087,6.718 75.946,14.859 75.946,29.464 78.232,31.75 107.188,31.75 110.363,28.575 U12.11@110.363,26.378 110.363,24.439 110.619,24.183 R41.1@110.744,24.183
IO3: R45.2 U12.15 | length 12
  Top Layer w0.254: U12.15@115.443,26.378 115.443,25.723 115.616,25.55 115.674,25.55 117.983,23.241 R45.2@117.983,15.494
IO4: R48.2 U12.16 | length 14.2
  Top Layer w0.254: U12.16@116.713,26.378 116.845,26.246 116.845,25.268 118.872,23.241 118.872,14.476 117.983,13.587 R48.2@117.983,13.462
IO5: R49.2 U12.17 | length 16.5
  Top Layer w0.254: R49.2@117.946,11.303 117.946,11.428 119.634,13.116 119.634,23.495 117.983,25.146 U12.17@117.983,26.378
M0: U3.26 U11.20 | length 127.7
  Top Layer w0.254: U3.26@36.048,33.007 41.643,33.007 47.371,38.735 62.103,38.735 68.707,45.339 68.707,58.801 73.533,63.627 v1(108.839,63.627) ; U11.20@129.564,81.154 129.552,81.142 129.552,76.917 129.667,76.802 v1(129.667,76.708)
  Bottom Layer w0.254: v1(108.839,63.627) 108.905,63.561 109.15,63.561 109.157,63.554 115.243,63.554 118.872,67.183 118.872,73.152 122.428,76.708 v1(129.667,76.708)
M1: U3.31 U11.21 | length 130.5
  Top Layer w0.254: U3.31@29.718,34.772 30.041,35.095 30.041,36.391 40.259,46.609 40.259,53.086 49.784,62.611 71.501,62.611 73.406,64.516 v1(110.109,64.516) ; v1(130.81,78.105) 130.822,78.117 130.822,81.142 U11.21@130.834,81.154
  Bottom Layer w0.254: v1(110.109,64.516) 114.681,64.516 117.729,67.564 117.729,74.168 121.666,78.105 v1(130.81,78.105)
MISO_CD: J8.7 J14.8 R62.2 U3.22 | length 195.5
  Top Layer w0.254: U3.22@36.048,27.927 38.341,27.927 v1(40.344,29.931) ; J14.8@108.966,95.758 111.252,93.472 153.035,93.472 159.798,86.709 J8.7@159.798,77.975 160.021,77.752 160.021,77.27 161.673,75.618 R62.2@161.798,75.618
  Bottom Layer w0.254: v1(40.344,29.931) 40.344,39.031 36.195,43.18 36.195,56.007 42.164,61.976 42.164,65.278 43.942,67.056 54.229,67.056 66.929,79.756 66.929,88.011 69.215,90.297 103.505,90.297 J14.8@108.966,95.758
MOSI_CD: J8.3 J14.6 R63.2 U3.32 | length 183.6
  Top Layer w0.254: U3.32@28.448,34.772 28.448,35.881 v1(34.256,41.69) ; J14.6@101.346,95.758 105.283,91.821 148.717,91.821 151.13,89.408 151.13,82.693 155.398,78.425 J8.3@155.398,77.975 155.398,76.078 154.74,75.42 R63.2@154.454,75.42
  Bottom Layer w0.254: v1(34.256,41.69) 33.655,42.291 33.655,55.88 40.259,62.484 40.259,66.04 42.572,68.353 52.986,68.353 65.278,80.645 65.278,88.9 68.199,91.821 97.409,91.821 J14.6@101.346,95.758
NetC41_1: C41.1 R36.1 R37.2 U10.4
NetD3_C: D3.C FL2.4
NetD4_C: D4.C L.2 U8.2
NetD5_C: D5.C L1.2 VR1.2
NetD6_C: D6.C L2.2 U10.2
NetD7_1: D7.1 R49.1 | length 3.6
  Top Layer w0.254: D7.1@114.3,8.636 114.983,9.319 114.983,9.665 116.496,11.178 R49.1@116.496,11.303
NetD7_3: D7.3 R48.1 | length 3.3
  Top Layer w0.254: D7.3@114.3,11.176 114.372,11.176 116.533,13.337 R48.1@116.533,13.462
NetD7_5: D7.5 R45.1 | length 3
  Top Layer w0.254: D7.5@114.3,13.716 115.755,15.171 116.335,15.171 116.533,15.369 R45.1@116.533,15.494
NetD8_2: D8.2 R47.1 | length 2.5
  Top Layer w0.254: R47.1@112.649,37.973 112.683,37.973 112.881,38.171 112.881,38.53 113.049,38.698 113.501,38.698 113.75,38.947 113.927,38.947 114.3,39.32 D8.2@114.3,39.37
NetJ1_A5: J1.A5 R1.2 | length 2.3
  Top Layer w0.254: J1.A5@13.105,7.747 13.128,7.77 13.128,8.522 13.716,9.11 R1.2@13.716,9.816
NetJ1_B5: J1.B5 R2.2 | length 2.1
  Top Layer w0.254: J1.B5@16.105,7.747 16.105,8.167 16.129,8.191 R2.2@16.129,9.816
NetJ2_A5: J2.A5 R8.2 | length 6.9
  Top Layer w0.254: J2.A5@38.08,92.532 38.103,92.555 38.103,93.167 40.059,95.123 41.412,95.123 42.801,93.734 R8.2@42.926,93.734
NetJ2_B5: J2.B5 R9.2 | length 6
  Top Layer w0.254: R9.2@30.607,93.734 31.477,93.734 32.176,94.433 33.966,94.433 35.057,93.342 35.057,92.555 J2.B5@35.08,92.532
NetP1_2: P1.2 R69.2 | length 2.6
  Top Layer w0.254: P1.2@104.267,66.167 104.312,66.122 106.762,66.122 R69.2@106.807,66.077
NetP2_1: P2.1 R69.1 | length 6.2
  Top Layer w0.254: P2.1@101.219,66.167 102.235,66.167 103.595,67.527 R69.1@106.807,67.527
NetQ1_1: Q1.1 R13.1 | length 2.2
  Top Layer w0.254: R13.1@42.418,66.04 42.418,66.165 42.856,66.603 Q1.1@42.856,68.011
NetQ2_1: Q2.1 R14.1 | length 4.8
  Top Layer w0.254: R14.1@40.968,64.262 40.959,64.253 40.959,62.034 42.356,60.637 42.356,60.462 42.554,60.264 Q2.1@42.729,60.264
NetQ3_1: Q3.1 R50.2 | length 20.6
  Top Layer w0.254: Q3.1@97.724,26.6 97.724,26.775 97.922,26.973 98.003,26.973 98.358,27.328 103.609,27.328 105.156,25.781 105.156,22.098 105.791,21.463 111.887,21.463 112.395,21.971 R50.2@112.395,22.733
NetQ4_1: Q4.1 R51.2 | length 31.8
  Top Layer w0.254: Q4.1@89.088,26.6 89.088,26.726 89.286,26.924 94.234,26.924 95.335,25.823 98.467,25.823 99.464,26.82 103.355,26.82 104.648,25.527 104.648,21.844 105.537,20.955 113.03,20.955 114.046,21.971 R51.2@114.046,22.733
NetQ5_1: Q5.1 R52.2 | length 42.7
  Top Layer w0.254: Q5.1@80.452,26.6 80.452,26.506 80.65,26.308 85.96,26.308 86.487,25.781 89.789,25.781 90.297,26.289 94.154,26.289 95.024,25.419 98.837,25.419 99.834,26.416 103.124,26.416 104.14,25.4 104.14,21.59 105.283,20.447 114.173,20.447 115.697,21.971 R52.2@115.697,22.733
NetQ6_1: Q6.1 R66.1 | length 2.5
  Top Layer w0.254: R66.1@87.122,72.771 87.122,73.708 88.09,74.676 Q6.1@88.265,74.676
NetQ6_3: Q6.3 R65.2 U15.2 U15.3 | length 11.5
  Top Layer w0.254: R65.2@85.672,78.359 85.672,75.819 Q6.3@85.865,75.626 86.04,75.626 86.238,75.428 86.238,75.253 86.278,75.213 86.278,72.054 85.979,71.755 85.979,70.368 86.751,69.596 U15.2@87.441,69.596 U15.3@87.441,68.326
NetR5_1: R5.1 U4.2 | length 28.4
  Top Layer w0.254: U4.2@33.528,82.296 33.622,82.202 34.384,82.202 36.576,80.01 36.576,73.66 37.338,72.898 37.338,61.595 40.987,57.946 41.204,57.946 R5.1@41.402,57.748
NetR7_1: R7.1 U4.3 | length 26.5
  Top Layer w0.254: U4.3@33.528,81.026 34.671,81.026 35.941,79.756 35.941,73.279 36.576,72.644 36.576,60.923 R7.1@39.751,57.748
NetR44_1: R44.1 U12.6 | length 3.3
  Top Layer w0.254: R44.1@110.998,37.973 111.123,37.973 112.67,36.426 112.73,36.426 112.903,36.253 U12.6@112.903,35.598
NetR68_1: R68.1 U15.1 | length 12.4
  Top Layer w0.254: R68.1@87.085,80.01 87.085,79.885 86.36,79.16 86.36,77.089 87.684,75.765 88.351,75.765 89.408,74.708 89.408,72.009 88.835,71.436 88.433,71.034 87.609,71.034 U15.1@87.441,70.866
PIN36: R5.2 U3.36 | length 30.3
  Top Layer w0.254: U3.36@23.368,34.772 23.368,36.703 23.876,37.211 v1@24.003,37.211 ; v1(27.178,39.37) 28.257,39.37 31.029,42.142 37.338,48.451 37.338,52.234 R5.2@41.402,56.298
  Bottom Layer w0.254: v1(24.003,37.298) 26.075,39.37 v1(27.178,39.37)
PIN37: R7.2 U3.37 | length 30.4
  Top Layer w0.254: U3.37@22.098,34.772 22.098,36.76 v1(22.636,37.298) ; v1(27.559,40.259) 27.58,40.28 28.24,40.28 36.703,48.743 36.703,53.25 R7.2@39.751,56.298
  Bottom Layer w0.254: v1(22.636,37.298) 25.597,40.259 v1(27.559,40.259)
PMODE0: R19.2 U6.45 | length 4.5
  Top Layer w0.254: U6.45@23.992,52.472 24.005,52.485 24.926,52.485 25.781,53.34 25.781,54.145 26.797,55.161 R19.2@26.797,55.286
PMODE1: R18.2 U6.44 | length 3.6
  Top Layer w0.254: U6.44@23.992,51.972 24.005,51.985 25.126,51.985 26.58,53.439 26.599,53.439 26.797,53.637 R18.2@26.797,53.762
PMODE2: R17.2 U6.43 | length 3.1
  Top Layer w0.254: U6.43@23.992,51.472 25.233,51.472 25.998,52.238 R17.2@26.797,52.238
REST: C9.1 Q2.3 R12.2 RESET.1 U3.3 | length 71.3
  Top Layer w0.254: v1(20.741,20.172) 20.741,17.359 U3.3@20.828,17.272 ; C9.1@32.409,49.022 32.409,50.863 33.909,52.363 33.909,52.686 33.636,52.959 32.766,52.959 31.623,54.102 v1(30.353,54.102) 30.353,60.235 R12.2@30.226,60.362 30.353,60.362 32.422,60.362 33.02,60.96 35.404,60.96 v1(35.46,60.903) ; v1(38.505,62.116) 38.571,62.049 38.571,61.759 39.116,61.214 Q2.3@40.329,61.214
  Bottom Layer w0.254: v1(20.741,20.172) 20.741,23.074 18.415,25.4 18.415,38.608 23.268,43.461 25.046,43.461 26.543,44.958 26.543,52.467 28.178,54.102 v1(30.353,54.102) ; v1(35.46,60.903) 35.517,60.96 37.35,60.96 v1(38.505,62.116)
RJ_RX_N: J3.P8 U7.4 | length 6.4
  Top Layer w0.254: U7.4@19.304,69.82 19.304,70.13 18.777,70.657 18.775,70.657 18.581,70.851 18.581,71.061 18.73,71.21 19.831,71.21 20.297,71.676 20.297,72.163 20.58,72.446 J3.P8@20.58,74.441
RJ_RX_P: J3.P7 U7.6 | length 6.4
  Top Layer w0.254: U7.6@17.404,69.82 17.404,70.13 17.931,70.657 17.933,70.657 18.127,70.851 18.127,71.249 18.542,71.664 19.643,71.664 19.843,71.864 19.843,72.163 19.56,72.446 J3.P7@19.56,74.441
RJ_TX_N: J3.P4 U5.4 | length 6.3
  Top Layer w0.254: U5.4@15.301,69.876 15.301,70.186 14.774,70.713 14.772,70.713 14.578,70.907 14.578,71.117 14.727,71.266 14.937,71.266 14.942,71.261 15.802,71.261 16.217,71.676 16.217,72.163 16.5,72.446 J3.P4@16.5,74.441
RJ_TX_P: J3.P3 U5.6 | length 6.3
  Top Layer w0.254: U5.6@13.401,69.876 13.401,70.186 13.928,70.713 13.93,70.713 14.124,70.907 14.124,71.305 14.539,71.72 15.127,71.72 15.132,71.715 15.614,71.715 15.763,71.864 15.763,72.163 15.48,72.446 J3.P3@15.48,74.441
RLY1: R50.1 U12.12 | length 2.6
  Top Layer w0.254: U12.12@111.633,26.378 111.633,24.82 112.27,24.183 R50.1@112.395,24.183
RLY2: R51.1 U12.13 | length 2.7
  Top Layer w0.254: U12.13@112.903,26.378 113.062,26.219 113.062,25.042 113.921,24.183 R51.1@114.046,24.183
RLY3: R52.1 U12.14 | length 2.9
  Top Layer w0.254: U12.14@114.173,26.378 114.346,26.205 114.346,25.409 115.572,24.183 R52.1@115.697,24.183
RLY_1: C57.1 D9.A J11.3 Q3.3 | length 28.2
  Top Layer w0.254: J11.3@99.327,4.318 96.774,6.871 Q3.3@96.774,24.2 96.822,24.248 99.813,24.248 D9.A@100.33,24.765 100.33,24.656 100.983,24.003 C57.1@103.124,24.003 ; C57.1@103.124,24.337 C57.1@103.124,24.352 ; C57.1@103.178,24.184 C57.1@103.368,24.374
RLY_2: C58.1 D10.A J11.4 Q4.3 | length 28.8
  Top Layer w0.254: C58.1@90.805,24.003 C58.1@90.805,24.008 ; D10.A@93.252,23.75 D10.A@93.472,23.97 ; D10.A@93.345,24.732 91.519,24.732 90.805,24.018 C58.1@90.805,24.008 ; J11.4@95.517,4.318 88.138,11.697 Q4.3@88.138,24.2 90.613,24.2 C58.1@90.805,24.008
RLY_3: C59.1 D11.A J11.5 Q5.3 | length 30.9
  Top Layer w0.254: D11.A@84.616,23.783 D11.A@84.836,24.003 ; D11.A@84.709,24.765 84.709,24.656 84.056,24.003 C59.1@82.169,24.003 81.972,24.2 Q5.3@79.502,24.2 79.502,16.51 91.694,4.318 J11.5@91.707,4.318
RTS: Q2.2 R13.2 U4.14 | length 23.1
  Top Layer w0.254: U4.14@39.028,81.026 38.683,81.026 37.211,79.554 37.211,74.041 37.973,73.279 37.973,67.31 39.243,66.04 R13.2@40.968,66.04 40.968,65.915 41.656,65.227 41.656,63.599 42.534,62.721 42.534,62.359 Q2.2@42.729,62.164
RX_LoRa: U3.21 U11.22 | length 132.8
  Top Layer w0.254: U3.21@36.048,26.657 39.23,26.657 48.768,36.195 62.992,36.195 70.993,44.196 70.993,58.928 74.395,62.33 115.002,62.33 119.253,66.581 119.253,68.961 122.428,72.136 130.175,72.136 132.104,74.065 U11.22@132.104,81.154
RX_N: C21.1 R22.2 R27.2 | length 5.9
  Top Layer w0.293: C21.1@19.304,63.414 18.997,63.107 18.706,63.107 18.464,62.866 18.464,62.238 18.636,62.067 18.744,62.067 18.923,61.888 R27.2@18.923,61.763 18.923,61.638 18.744,61.459 18.611,61.459 18.439,61.288 18.439,61.045 18.626,60.859 19.095,60.859 19.525,60.428 19.525,59.974 19.697,59.802 19.887,59.802 R22.2@20.066,59.624
RX_P: C22.1 R25.2 R26.2 | length 5.8
  Top Layer w0.293: C22.1@17.272,63.414 17.272,63.399 17.596,63.075 17.8,63.075 17.972,62.904 17.972,62.238 17.8,62.067 17.692,62.067 17.513,61.888 R26.2@17.513,61.763 17.513,61.638 17.692,61.459 17.825,61.459 17.997,61.288 17.997,60.862 18.442,60.416 18.911,60.416 19.083,60.245 19.083,59.974 18.911,59.802 18.721,59.802 R25.2@18.542,59.624
RXD_1: J11.8 U13.12 | length 33.9
  Top Layer w0.254: U13.12@65.786,28.499 65.89,28.394 65.89,27.074 67.129,25.835 73.479,25.835 75.311,24.003 75.311,14.097 80.277,9.131 J11.8@80.277,4.318
RXD_2: J13.1 U13.14 | length 34.1
  Top Layer w0.254: U13.14@63.246,28.499 63.246,26.797 64.77,25.273 73.315,25.273 74.676,23.912 74.676,5.233 74.181,4.737 J13.1@74.181,4.318
S0: U3.5 U13.10 | length 64.4
  Top Layer w0.254: U3.5@23.368,17.272 v1(23.368,19.685) ; v1(67.564,26.67) 68.31,27.416 68.31,28.482 U13.10@68.326,28.499
  Bottom Layer w0.254: v1(23.368,19.685) 48.387,19.685 52.451,23.749 52.451,30.988 53.848,32.385 60.071,32.385 61.722,30.734 61.722,26.162 62.484,25.4 66.294,25.4 v1(67.564,26.67)